# Altium PCB Sound_Sensor.PcbDoc (part 4 of 6)
Units mm, origin at the board's own origin, x right, y up, seen from the top; angles counter-clockwise.
Board outline 90.25 x 88.01 mm, 2 copper layers (Top Layer, Bottom Layer), stack 1.448 mm thick; 369 components, 272 nets, 1045 pads, 508 vias.
Unrouted connection lines stored in the file: 15.
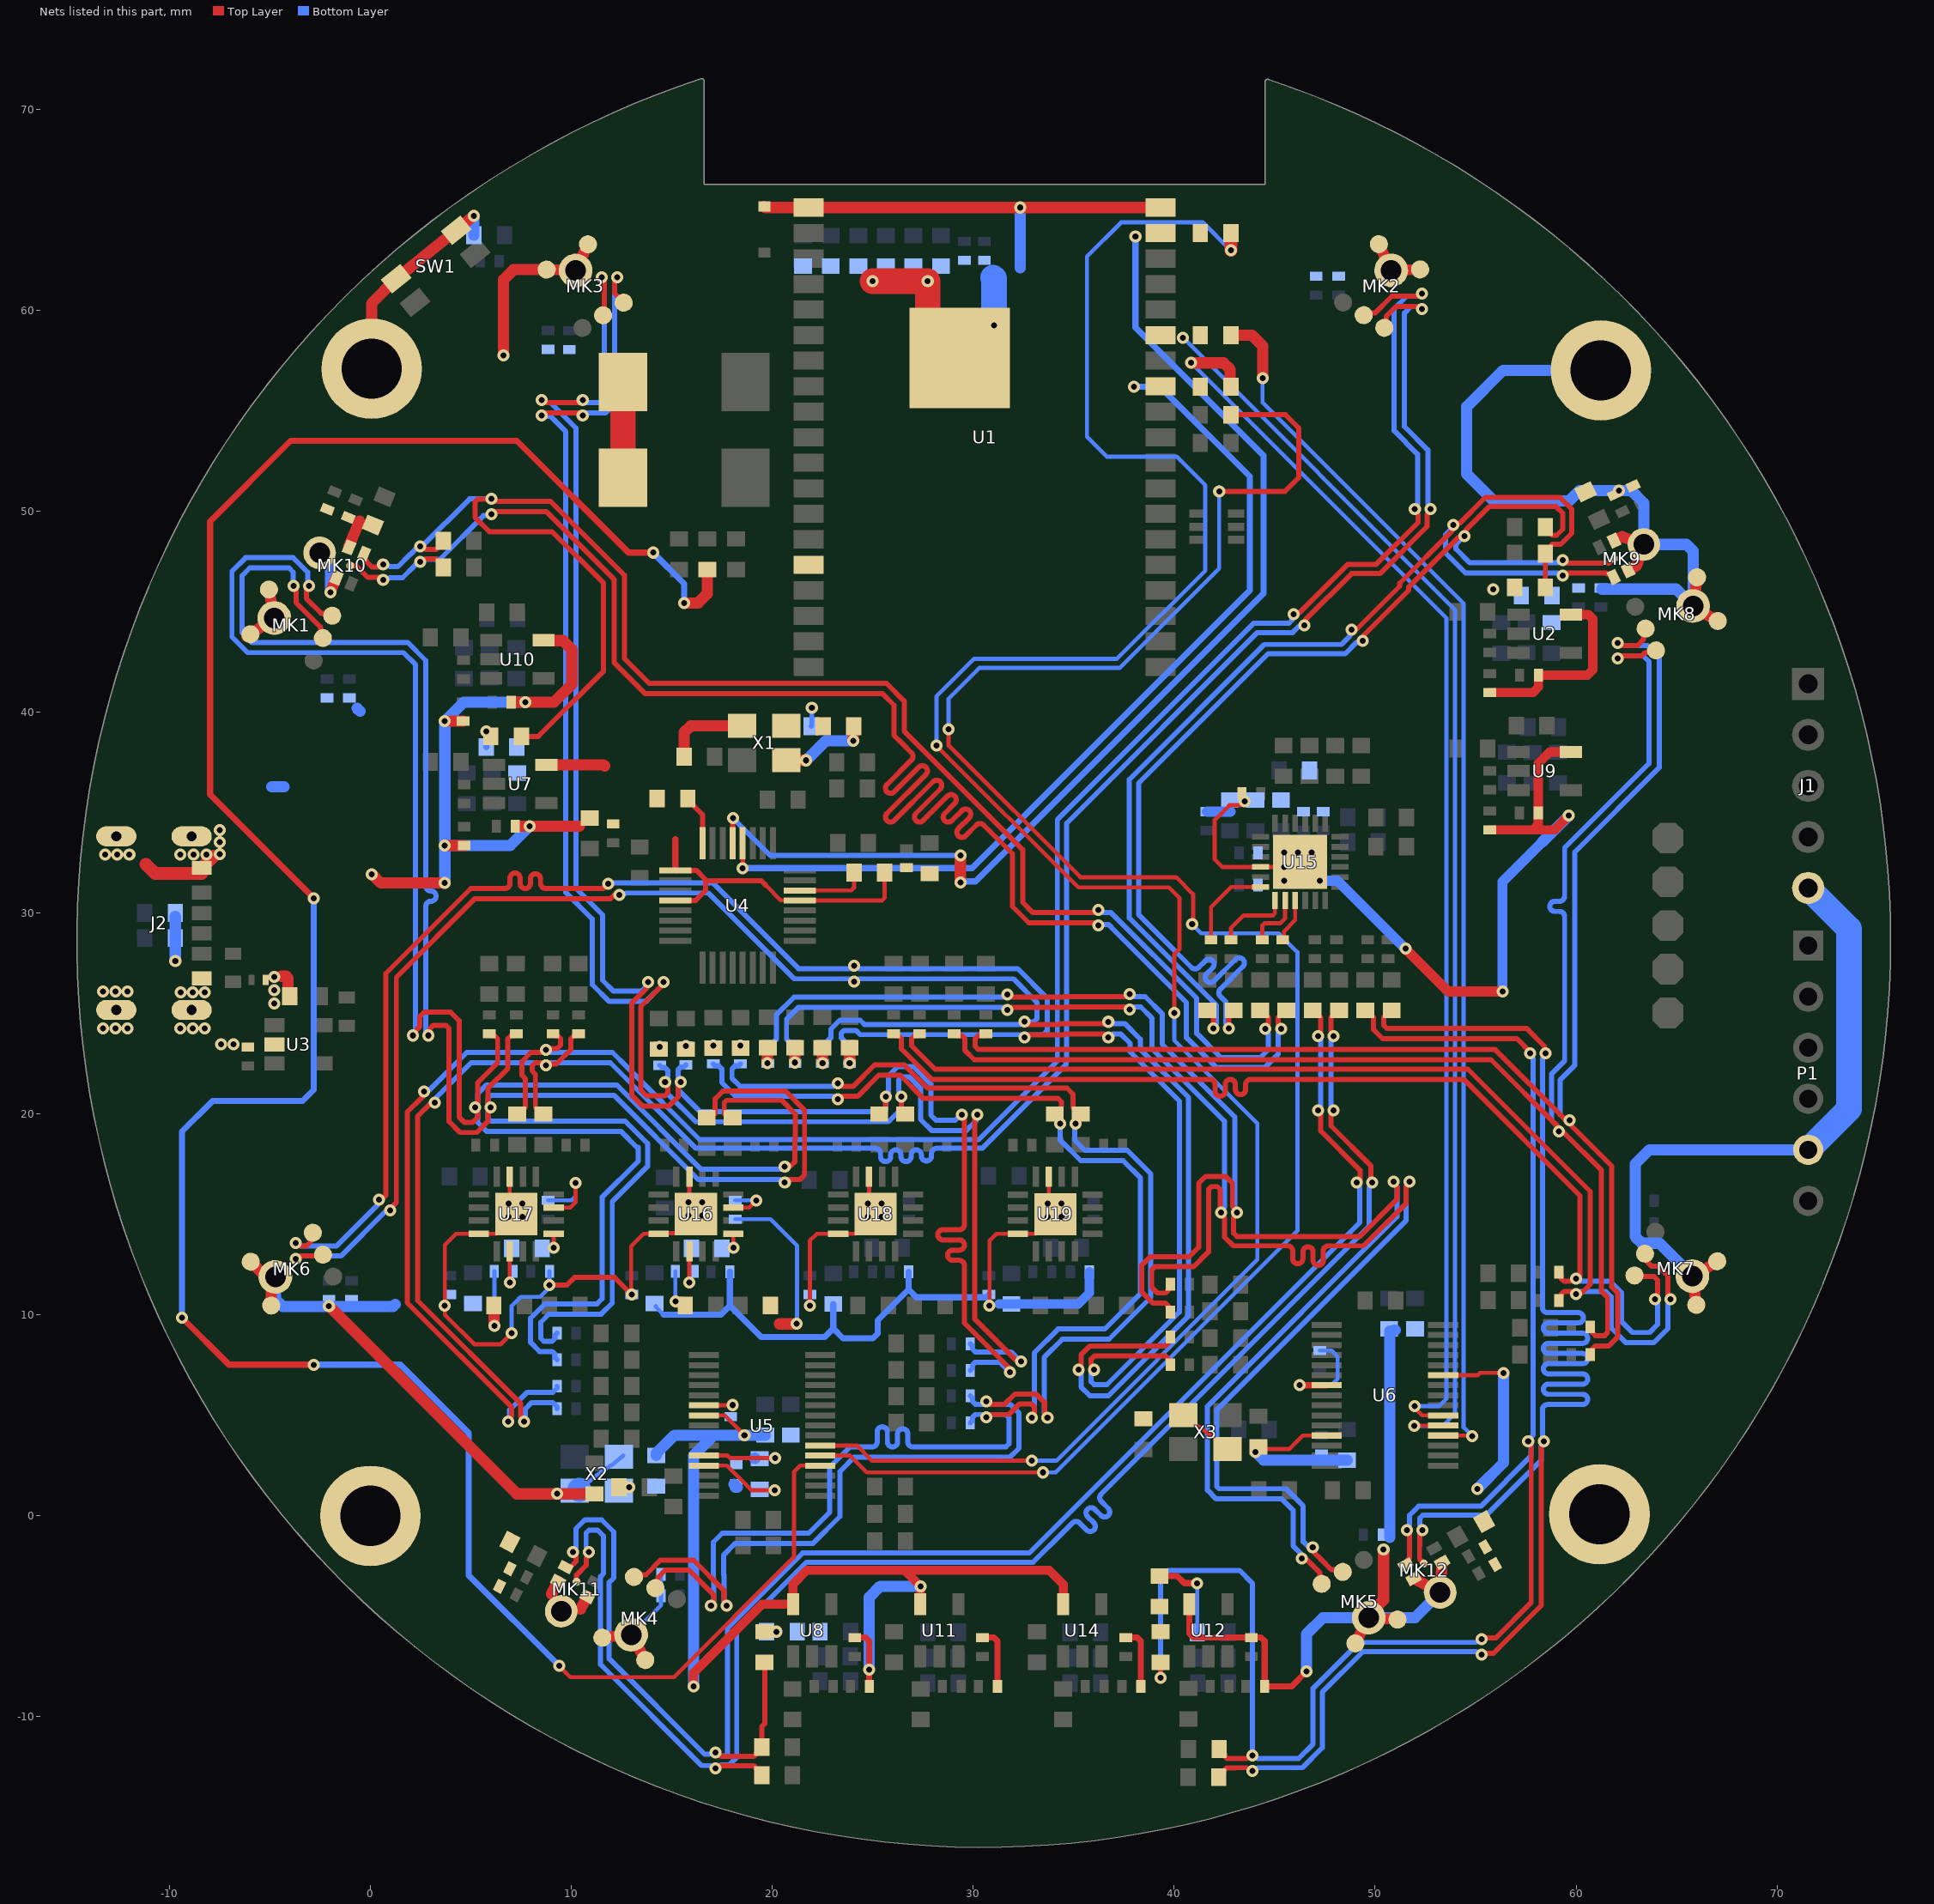
[diagram p3: the nets of this part, all layers, seen from the top]

## Via types
v1: diameter 0.6, hole 0.3, Top Layer to Bottom Layer, 508 vias

## Nets (pads, with @x,y where several pads share a name; then routed paths per layer and width w, separated by ;. In a path a pad name is that pad's centre, name@x,y a point inside that pad or via, vN(x,y) a via of type N, cw(c..) or ccw(c..) an arc to the next point about the centre after c; other vN are vias at no path point) (continued)
GND: C2.2 C3.2 C4.2 C5.2 C6.2 C7.2 C8.2 C9.2 C10.2 C11.2 C12.2 C13.2 C14.2 C15.2 C16.2 C17.2 C18.2 C19.2 C20.2 C21.2 C22.2 C27.2 C29.2 C31.2 C33.2 C34.2 C35.2 C36.2 C37.2 C38.2 C39.2 C40.2 C41.2 C42.2 C43.1 C44.1 C53.1 C54.1 C55.2 C56.2 C57.2 C58.2 C59.2 C61.1 C62.1 C70.1 C71.1 C72.2 C73.1 C74.1 C75.2 C76.2 C77.2 C78.2 C79.2 C80.2 C81.2 C82.2 C83.2 C84.2 C85.2 C86.2 C90.1 C91.1 C96.2 C97.2 C98.1 C99.1 C108.1 C112.1 C113.1 C114.1 C116.1 C118.1 C119.1 C120.2 C121.1 C122.1 C123.2 C124.1 C125.2 C126.2 C127.2 C128.1 C129.2 C130.2 C131.2 C132.2 C133.2 C134.2 C135.1 C136.1 C#2.2 D1.2 D2.1 J1.5 J2.A12 J2.B12 J2.MH1 J2.MH2 J2.MH3 J2.MH4 MK1.2 MK1.3 MK1.4 MK2.2 MK2.3 MK2.4 MK3.2 MK3.3 MK3.4 MK4.2 MK4.3 MK4.4 MK5.2 MK5.3 MK5.4 MK6.2 MK6.3 MK6.4 MK7.2 MK7.3 MK7.4 MK8.2 MK8.3 MK8.4 MK9.2 MK9.3 MK9.4 MK10.2 MK10.3 MK10.4 MK11.2 MK11.3 MK11.4 MK12.2 MK12.3 MK12.4 P1.5 pad.MH1 pad.MH2 pad.MH3 pad.MH4 R11.2 R12.2 R19.2 R20.2 R21.2 R31.2 R32.2 R33.2 R37.2 R41.2 SW1.2 U1.1 U1.15 U1.38 U1.39 U2.5 U3.2 U4.13 U4.25 U4.28 U5.7 U5.12 U6.7 U6.12 U6.25 U7.5 U8.5 U9.5 U10.5 U11.5 U12.5 U14.5 U15.4 U15.25 U16.11 U16.16 U16.17 U17.11 U17.16 U17.17 U18.11 U18.16 U18.17 U19.11 U19.16 U19.17 X1.2 X1.4 X2.2 X2.4 X3.2 X3.4 | length 510.8
  Top Layer w0.203: U17.11@6.938,16.873 6.938,15.338 U17.17@7.263,15.013 6.288,14.038 4.259,14.038 3.708,13.487 v1(3.708,10.465) 3.708,10.008 5.182,8.534 6.477,8.534 v1(7.036,9.093) ; v1(13.005,11.011) 12.979,11.036 12.979,13.411 13.606,14.038 U16.16@14.344,14.038 14.361,14.021 14.405,14.065 15.255,14.065 U16.17@16.204,15.013 15.879,15.338 U16.11@15.879,16.873 ; U5.12@16.595,2.497 17.746,2.497 18.974,1.27 v1(20.121,1.27) ; U5.7@16.595,4.997 17.634,4.997 v1(18.618,4.013) ; 19.685,31.369 20.421,30.633 21.365,30.633 U4.13@21.38,30.617 25.461,30.617 25.595,30.752 C22.2@25.595,32.006 ; v1(21.869,10.465) 21.869,13.691 22.217,14.038 U18.16@23.284,14.038 24.169,14.038 U18.17@25.144,15.013 24.819,15.338 U18.11@24.819,16.873 ; v1(30.81,10.463) 30.81,13.689 31.158,14.036 U19.16@32.225,14.036 33.11,14.036 U19.17@34.085,15.011 33.76,15.336 U19.11@33.76,16.871 ; X3.4@40.454,5.016 40.875,4.665 40.882,4.66 41.885,3.956 41.892,3.951 X3.2@42.654,3.316 ; v1(43.51,35.56) 43.307,35.357 42.745,35.357 42.016,34.628 42.016,32.66 42.387,32.289 46.021,32.289 U15.25@46.271,32.539 ; C74.1@44.188,3.327 45.745,3.327 46.414,3.996 U6.12@47.587,3.996 ; v1(45.466,31.598) 46.271,32.403 U15.25@46.271,32.539 ; U15.25@47.244,31.521 46.271,32.494 U15.25@46.271,32.539 ; U6.25@53.387,6.996 55.104,6.996 55.22,7.112 v1(56.388,7.112)
  Top Layer w0.254: v1(8.904,11.481) 9.779,11.481 10.16,11.862 12.154,11.862 v1(13.005,11.011) ; U4.28@15.18,30.617 16.19,30.617 16.688,31.115 16.688,31.648 16.219,32.117 U4.25@15.18,32.117 ; 16.688,31.598 19.456,31.598 19.685,31.369
  Top Layer w0.305: U4.25@15.18,32.117 15.18,33.664 ; C108.1@24.142,-6.096 C108.1@24.105,-6.058 24.65,-6.058 24.828,-6.236 v1(24.828,-7.645) R21.2@24.828,-8.484 ; C114.1@30.48,-6.058 31.025,-6.058 31.204,-6.236 R33.2@31.204,-8.484 ; C118.1@37.516,-6.058 C118.1@37.592,-6.058 ; C118.1@37.617,-6.058 38.163,-6.058 38.341,-6.236 R41.2@38.341,-8.484 ; U12.5@40.755,-4.397 40.755,-5.856 40.957,-6.058 C116.1@43.84,-6.058 44.322,-6.058 44.501,-6.236 R37.2@44.501,-8.484 45.847,-8.484 v1(46.584,-7.747) ; v1(46.247,6.496) U6.7@47.587,6.496
  Top Layer w0.457: v1(16.078,-8.484) 16.078,-7.823 19.504,-4.397 U8.5@21.034,-4.397 21.034,-3.401 21.719,-2.715 26.58,-2.715 ; U11.5@27.369,-4.397 27.369,-3.505 26.58,-2.715 ; U14.5@34.481,-4.397 34.481,-3.417 33.78,-2.715 26.58,-2.715 ; R31.2@55.702,34.138 57.847,34.138 ; R19.2@55.702,40.97 57.86,40.97 58.128,41.238 C90.1@58.128,41.834 60.565,41.834 60.833,42.102 60.833,44.628 60.618,44.843 U2.5@59.738,44.843 U2.5@59.809,44.771 ; v1(59.639,34.849) 58.928,34.138 57.847,34.138 ; U9.5@59.738,38.01 58.686,38.01 58.115,37.44 C112.1@58.115,34.976 58.115,34.405 57.847,34.138
  Top Layer w0.508: v1(51.511,28.219) 53.645,26.086 v1(56.337,26.086)
  Top Layer w0.559: MK1.4@-6.148,43.745 MK1.4@-5.966,43.869 -5.933,43.891 MK1.3@-4.775,44.679 ; MK6.2@-5.949,12.645 -5.192,11.887 MK6.3@-4.724,11.887 -4.932,11.68 MK6.4@-4.932,10.462 ; MK1.2@-5.044,46.093 MK1.3@-4.775,44.679 ; MK1.3@-4.666,44.753 MK1.3@-4.775,44.679 ; -4.444,26.848 -4.188,26.848 -4.099,26.758 -4.099,25.968 C2.2@-3.912,25.781 ; v1(-2.057,10.439) 7.29,1.092 C62.1@10.986,1.092 ; v1(-1.986,45.951) MK10.4@-1.707,46.688 ; MK10.2@-1.081,48.198 -1.079,48.203 -0.6,49.358 -0.569,49.422 -0.532,49.498 ; pad.MH1@0.068,57.075 0.068,60.336 SW1.2@1.283,61.551 1.552,61.768 4.007,63.756 SW1.2@4.275,63.973 4.54,64.195 v1(5.156,64.694) ; v1(0.076,31.928) 0.508,31.496 v1(3.708,31.496) ; v1(3.708,33.35) R20.2@4.674,33.35 ; v1(3.708,39.548) R32.2@4.623,39.548 ; v1(6.629,57.734) 6.629,61.519 7.122,62.012 MK3.4@8.777,62.012 MK3.3@10.216,61.967 ; C113.1@7.061,40.486 v1(7.72,40.486) 9.142,40.486 10.033,41.377 10.033,43.104 9.586,43.551 8.64,43.551 U10.5@8.62,43.571 ; C91.1@7.264,34.315 v1(7.923,34.315) 10.414,34.315 ; U7.5@8.76,37.375 11.596,37.375 11.659,37.313 ; 9.017,-3.886 MK11.2@9.352,-3.262 ; MK3.3@10.172,62.012 MK3.3@10.216,61.967 ; 10.467,-4.641 MK11.4@10.803,-4.017 ; MK3.2@10.83,63.177 MK3.2@10.83,63.27 MK3.3@10.216,61.967 ; MK4.2@11.547,-6.063 MK4.3@12.979,-5.918 MK4.4@13.683,-7.175 ; C44.1@15.613,37.771 15.613,38.98 15.941,39.307 X1.2@18.501,39.307 ; D1.2@19.609,65.158 19.609,65.149 19.658,65.1 U1.1@21.819,65.1 v1(32.334,65.1) U1.38@39.319,65.1 ; X1.4@20.701,37.607 20.716,37.592 v1(21.692,37.592) ; v1(24.028,38.557) 24.036,38.565 24.036,39.276 C43.1@24.054,39.294 ; MK5.2@49.019,-6.35 MK5.3@49.678,-5.069 50.125,-5.069 49.97,-4.915 49.97,-4.632 50.419,-4.183 v1(50.419,-1.676) ; MK5.3@50.123,-5.098 MK5.4@51.115,-5.164 ; MK2.4@50.186,63.186 MK2.4@50.186,63.279 MK2.3@50.8,61.976 MK2.2@52.239,62.02 ; MK12.2@51.911,-3.123 MK12.3@53.238,-3.81 MK12.4@53.334,-2.318 ; MK9.4@61.891,48.535 62.293,48.724 MK9.3@63.373,48.336 62.997,47.249 MK9.2@62.595,47.06 ; MK7.2@66.01,10.564 MK7.2@65.984,10.493 MK7.3@65.789,11.92 65.949,11.943 MK7.4@67.021,12.666 ; MK8.4@66.017,46.702 MK8.3@65.823,45.275 65.851,45.196 MK8.2@67.054,44.528
  Top Layer w0.635: -11.171,32.426 -10.708,31.962 J2.B12@-8.391,31.962 ; J2.B12@-8.324,32.308 J2.B12@-8.391,32.241 -7.815,32.817
  Top Layer w1.27: C21.2@12.571,51.943 C19.2@12.571,56.413 C19.2@12.571,56.693 ; v1(24.994,61.443) v1(27.737,61.443) 27.737,59.206 U1.39@29.328,57.615
  Bottom Layer w0.203: v1(7.036,9.093) 7.036,10.439 7.493,10.897 8.458,10.897 v1@8.915,11.354 ; v1@8.915,11.481 C99.1@8.915,12.167 ; X2.2@10.398,1.297 11.241,1.999 11.248,2.005 11.96,2.504 12,2.504 X2.4@12.598,2.997 ; MK4.3@12.979,-5.918 14.465,-4.432 C13.2@14.465,-3.988 C14.2@14.465,-2.909 ; C96.2@14.203,10.448 14.203,10.41 14.605,10.008 ; C134.2@30.582,10.871 30.81,10.643 v1(30.81,10.463) ; 42.812,35.039 42.901,34.95 42.926,34.95 ; v1(46.247,6.496) 47.822,6.496 48.133,6.807 48.133,7.925 47.828,8.23 C72.2@47.244,8.23
  Bottom Layer w0.305: 14.605,10.008 17.45,10.008 17.894,10.452 ; C98.1@17.894,12.141 17.894,10.452 ; 22.538,8.89 19.456,8.89 17.894,10.452 ; 22.606,8.89 23.038,9.322 ; C131.2@23.038,10.541 23.038,9.322 ; C135.1@26.784,12.141 26.784,11.265 ; C134.2@30.785,11.011 30.645,10.871 30.582,10.871 27.178,10.871 26.784,11.265 ; 23.038,9.322 23.52,8.839 25.019,8.839 25.248,9.068 25.248,9.728 26.784,11.265
  Bottom Layer w0.457: 31.286,10.541 C132.2@31.902,10.541 35.23,10.541 35.776,11.087 C136.1@35.776,12.141
  Bottom Layer w0.508: C123.2@41.631,35.039 42.812,35.039 ; v1(47.244,31.598) 48.133,31.598 v1(51.511,28.219) ; v1(56.337,26.086) 56.337,31.547 58.306,33.515
  Bottom Layer w0.559: v1(-9.703,27.61) R11.2@-9.703,28.753 R12.2@-9.703,29.82 ; -4.902,36.284 -4.28,36.284 ; MK6.3@-4.724,11.887 -4.724,10.77 -4.372,10.417 -2.061,10.417 -2.057,10.42 1.137,10.42 1.245,10.528 ; MK10.3@-2.524,47.916 -1.986,47.379 v1(-1.986,45.951) ; -0.66,40.183 -0.508,40.03 ; v1(3.708,31.496) v1(3.708,33.35) ; C20.2@5.156,63.729 v1(5.156,64.694) ; v1(7.72,40.486) 4.647,40.486 v1(3.708,39.548) v1(3.708,33.35) ; v1(7.923,34.315) 6.958,33.35 v1(3.708,33.35) ; C61.1@14.224,2.997 14.224,3.097 15.142,4.015 17.096,4.015 ; v1(16.078,-8.484) 16.078,2.997 17.096,4.015 ; C53.1@18.101,1.578 18.263,1.416 C53.1@18.151,1.416 ; v1(18.618,4.013) 17.934,4.013 17.932,4.015 17.096,4.015 ; v1@18.619,4.014 C56.2@19.652,4.015 ; v1(21.692,37.592) 22.657,38.557 v1(24.028,38.557) ; v1(24.828,-7.645) 24.828,-4.051 25.375,-3.505 v1(27.381,-3.505) ; 32.334,62.103 v1(32.334,65.1) ; v1(44.044,3.175) 44.055,3.175 44.46,2.77 C71.1@48.608,2.77 ; v1(46.584,-7.747) 46.584,-5.893 47.407,-5.069 MK5.3@49.678,-5.069 51.979,-5.069 MK12.3@53.238,-3.81 ; 50.724,-1.068 C57.2@50.724,9.195 ; C57.2@50.838,9.144 50.94,9.246 C57.2@51.003,9.246 ; v1(55.093,1.346) 56.388,2.642 v1(56.388,7.112) ; 58.306,33.515 v1(59.639,34.849) ; pad.MH4@61.232,56.995 56.36,56.995 54.559,55.194 54.559,51.841 55.905,50.495 59.65,50.495 60.164,51.009 62.758,51.009 63.373,50.394 MK9.3@63.373,48.336 65.495,48.336 65.823,48.009 MK8.3@65.823,45.275 64.984,46.114 C18.2@61.277,46.114 ; C9.2@62.943,14.501 62.943,13.891 63.271,13.564 64.146,13.564 MK7.3@65.789,11.92 ; C9.2@62.943,14.539 C10.2@62.943,15.681 62.943,17.503 63.652,18.212 P1.5@71.552,18.212
  Bottom Layer w1.194: X2.2@10.395,1.294 X2.2@10.398,1.297
  Bottom Layer w1.27: 30.988,61.62 31.039,61.57 v1(31.039,59.233) ; P1.5@71.552,18.212 73.584,20.244 73.584,29.21 J1.5@71.552,31.242
  other v1: 9.296,1.092 6.883,14.886 7.569,14.886 24.765,14.886 25.451,14.886 33.706,14.884 34.392,14.884 15.824,14.937 16.51,14.937 6.883,15.546 7.569,15.546 24.765,15.546 25.451,15.546 33.706,15.545 34.392,15.545 15.824,15.597 16.51,15.597 -7.421,23.47 -6.816,23.47 -13.292,24.257 -12.687,24.257 -12.082,24.257 -9.449,24.257 -8.844,24.257 -8.239,24.257 -4.789,25.485 -9.441,26.048 -8.836,26.048 -8.231,26.048 -13.292,26.086 -12.687,26.086 -12.082,26.086 -4.789,26.154 -4.789,26.822 45.466,32.283 -13.199,32.897 -12.594,32.897 -11.989,32.897 -9.449,32.897 -8.797,32.897 -8.145,32.897 -7.493,32.919 45.466,33.02 46.152,33.02 46.838,33.02 -7.493,33.524 -7.493,34.129 62.132,51.009
INTA: SB1.2 U5.21 | length 109.1
  Top Layer w0.203: U5.21@22.395,3.497 24.214,3.497 24.968,2.743 v1(32.918,2.743) ; v1(28.172,38.325) 35.23,31.267 39.751,31.267 40.259,30.759 40.259,28.184 40.005,27.93 v1(40.005,25.019)
  Top Layer w0.635: v1(42.824,62.967) SB1.2@42.824,63.83
  Bottom Layer w0.203: v1(28.172,38.325) 28.172,40.77 30.048,42.647 37.16,42.647 41.547,47.033 41.547,51.283 40.124,52.705 36.652,52.705 35.662,53.696 35.662,62.662 37.363,64.364 41.427,64.364 v1(42.824,62.967) ; v1(32.918,2.743) 34.138,2.743 44.145,12.751 44.145,12.827 44.145,13.894 44.145,19.533 40.005,23.673 v1(40.005,25.019)
INTA#: SB3.2 U6.21 | length 63.2
  Top Layer w0.203: v1(51.968,5.461) 51.968,5.364 52.333,5 53.383,5 U6.21@53.387,4.996
  Top Layer w0.559: v1(40.843,57.379) 40.851,57.371 42.462,57.371 42.79,57.043 42.79,56.22 SB3.2@42.824,56.185
  Bottom Layer w0.203: v1(40.843,57.379) 53.543,44.679 53.543,5.817 53.188,5.461 v1(51.968,5.461)
INTB: SB4.2 U5.20 | length 98.4
  Top Layer w0.203: U5.20@22.395,2.997 23.867,2.997 24.705,2.159 v1(33.477,2.159) ; v1(28.778,39.141) 28.778,38.329 35.331,31.775 40.107,31.775 40.945,30.937 40.945,29.489 v1(40.894,29.439)
  Top Layer w0.254: v1(42.24,50.978) 45.517,50.978 46.203,51.664 46.203,54.127 45.542,54.788 SB4.2@42.824,54.788
  Bottom Layer w0.203: v1(28.778,39.141) 28.778,40.665 30.302,42.189 37.287,42.189 42.24,47.142 v1(42.24,50.978) v1@42.24,51.183 ; v1(33.477,2.159) 34.112,2.159 46.135,14.182 46.135,28.053 45.207,28.981 41.351,28.981 v1(40.894,29.439)
INTB#: SB2.1 U1.33 U6.20 | length 62.9
  Top Layer w0.203: v1(51.943,4.47) 51.956,4.483 53.375,4.483 U6.20@53.387,4.496
  Bottom Layer w0.203: v1(40.437,58.623) 53.975,45.085 53.975,5.084 53.362,4.47 v1(51.943,4.47)
INTC: SB5.1 U5.19 | length 129
  Top Layer w0.203: v1(9.398,-7.468) 9.957,-8.026 15.113,-8.026 21.082,-2.057 21.082,2.184 21.395,2.497 U5.19@22.395,2.497
  Top Layer w0.305: v1(-9.373,9.855) -7.036,7.518 v1(-2.819,7.518) ; v1(-2.819,30.734) -7.976,35.89 -7.976,49.479 -3.962,53.492 7.286,53.492 12.849,47.93 v1(14.072,47.93)
  Top Layer w0.559: v1(15.621,45.415) 15.629,45.423 16.315,45.423 16.764,45.872 SB5.1@16.764,47.092
  Bottom Layer w0.305: v1(-9.373,9.855) -9.373,19.126 -7.849,20.65 -3.368,20.65 -2.819,21.199 v1(-2.819,30.734) ; v1(-2.819,7.518) 1.499,7.518 4.902,4.115 4.902,-2.972 v1(9.398,-7.468) ; v1(14.072,47.93) 15.621,46.38 15.621,45.45 v1@15.603,45.433
INTC#: SB2.2 U6.19 | length 62
  Top Layer w0.203: U6.19@53.387,3.996 54.805,3.996 v1(54.839,3.962)
  Top Layer w0.559: SB2.2@42.926,58.585 42.824,58.687 SB2.2@42.824,58.75 43.869,58.75 44.399,58.22 v1(44.399,56.617)
  Bottom Layer w0.203: v1(44.399,56.617) 44.399,55.397 54.407,45.39 54.407,4.394 v1(54.839,3.962)
M2_OUT1_N: MK9.6 SB55.1 SB84.1 | length 57.7
  Top Layer w0.254: v1(42.723,24.257) 42.723,24.903 SB84.1@42.966,25.146 ; v1(49.378,43.536) 49.454,43.612 49.454,43.838 51.675,46.06 51.675,46.214 54.141,48.68 ; 54.52,49.059 55.677,50.216 59.012,50.216 59.334,49.894 59.334,49.09 59.038,48.793 58.814,48.793 58.471,49.136 SB55.1@58.471,49.2 ; 59.59,47.396 61.63,47.396 61.859,47.625 MK9.6@61.881,47.625
  Bottom Layer w0.254: v1(42.723,24.257) 42.723,24.351 42.563,24.511 42.563,24.859 42.563,25.586 42.297,25.851 cw(c42.477,26.03) 42.297,26.21 43.422,27.335 ccw(c43.242,27.514) 43.422,27.694 ccw(c43.242,27.514) 43.063,27.694 41.98,26.611 cw(c41.8,26.791) 41.621,26.611 cw(c41.8,26.791) 41.621,26.97 41.913,27.262 ccw(c41.733,27.442) 41.913,27.621 ccw(c41.733,27.442) 41.553,27.621 41.22,27.288 cw(c41.04,27.467) 40.861,27.288 39.23,28.918 38.227,29.921 38.227,36.449 44.679,42.901 48.516,42.901 49.075,43.46 49.302,43.46 v1(49.378,43.536) ; v1(54.444,48.756) 54.016,48.328 54.016,48.118 54.71,47.423 59.106,47.423 59.241,47.558 v1(59.334,47.558)
M2_OUT1_P: MK9.1 SB31.1 SB54.1 SB83.1 | length 58
  Top Layer w0.254: SB83.1@41.656,25.146 41.691,25.146 41.945,24.892 v1(41.945,24.257) ; v1(48.828,44.086) 48.904,44.162 49.13,44.162 51.218,46.249 51.218,46.403 53.818,49.004 ; 54.197,49.382 55.487,50.673 59.202,50.673 59.792,50.083 59.792,48.901 59.227,48.336 58.814,48.336 58.471,47.993 SB54.1@58.471,47.879 SB31.1@58.471,46.203 ; v1@59.563,46.915 61.272,46.915 61.274,46.917 61.484,46.917 61.535,46.867 61.718,46.867 MK9.1@61.871,46.714
  Bottom Layer w0.254: v1(41.945,24.257) 41.945,24.351 42.105,24.511 42.105,25.408 37.77,29.743 37.77,36.638 44.489,43.358 48.327,43.358 48.752,43.783 48.752,44.01 v1(48.828,44.086) ; v1(53.894,49.306) 53.894,49.213 53.508,48.826 53.508,47.907 54.5,46.915 59.106,46.915 59.241,46.78 v1(59.334,46.78)
M2_OUT2_N: MK10.6 SB57.1 SB86.1 | length 86
  Top Layer w0.254: MK10.6@-0.997,47.284 -0.982,47.269 -0.698,47.269 -0.131,46.703 v1@0.406,46.703 ; 2.757,47.625 3.264,47.625 3.632,47.257 SB57.1@3.632,47.193 ; v1@6.147,49.962 6.15,49.965 8.766,49.965 12.141,46.59 12.141,42.443 13.665,40.919 25.476,40.919 26.06,40.335 26.06,38.837 26.48,38.418 26.929,37.968 cw(c26.749,37.789) 26.929,37.609 25.707,36.387 ccw(c25.886,36.208) 25.707,36.028 ccw(c25.886,36.208) 26.066,36.028 27.288,37.25 cw(c27.467,37.07) 27.647,37.25 cw(c27.467,37.07) 27.647,36.891 25.712,34.956 ccw(c25.892,34.776) 25.712,34.597 ccw(c25.892,34.776) 26.071,34.597 28.006,36.532 cw(c28.186,36.352) 28.365,36.532 cw(c28.186,36.352) 28.365,36.172 27.149,34.956 ccw(c27.328,34.776) 27.149,34.597 ccw(c27.328,34.776) 27.508,34.597 28.725,35.813 cw(c28.904,35.634) 29.084,35.813 cw(c28.904,35.634) 29.084,35.454 28.579,34.949 ccw(c28.759,34.77) 28.579,34.59 ccw(c28.759,34.77) 28.938,34.59 29.443,35.095 cw(c29.623,34.915) 29.802,35.095 cw(c29.623,34.915) 29.802,34.736 29.261,34.194 ccw(c29.441,34.015) 29.261,33.835 ccw(c29.441,34.015) 29.62,33.835 30.161,34.376 cw(c30.341,34.197) 30.521,34.376 31.953,32.944 31.953,31.42 31.953,30.32 32.767,29.507 v1@35.992,29.507 ; v1@45.185,24.46 45.185,24.809 45.522,25.146 SB86.1@45.586,25.146
  Bottom Layer w0.254: v1(0.635,46.568) 0.701,46.634 0.909,46.634 0.957,46.682 1.604,46.682 2.214,47.292 ; v1(2.489,47.465) 2.583,47.465 2.718,47.6 3.462,47.6 5.631,49.769 5.954,49.769 v1(6.02,49.835) ; v1(36.22,29.372) 36.277,29.429 36.732,29.429 36.881,29.28 36.881,29.27 40.615,25.536 40.615,23.793 42.106,22.301 44.508,22.301 45.185,22.978 45.185,24.003 45.32,24.138 v1(45.32,24.232)
M2_OUT2_P: MK10.1 SB33.1 SB56.1 SB85.1 | length 86.2
  Top Layer w0.254: MK10.1@-0.313,47.886 -0.313,47.643 -0.189,47.519 -0.189,47.479 0.079,47.211 v1@0.406,47.211 ; 2.757,48.082 3.264,48.082 3.632,48.451 SB56.1@3.632,48.514 ; v1@6.02,50.473 8.977,50.473 12.649,46.801 12.649,42.654 13.876,41.427 25.687,41.427 26.568,40.546 26.568,39.047 32.461,33.154 32.461,30.531 32.977,30.015 v1@35.992,30.015 ; v1(6.02,50.613) 6,50.593 5.356,50.593 5.207,50.444 5.207,49.682 5.918,48.971 9.042,48.971 11.608,46.405 11.608,42.037 8.357,38.786 SB33.1@7.518,38.786 ; SB85.1@44.276,25.146 44.339,25.146 44.677,24.809 v1@44.677,24.46
  Bottom Layer w0.254: v1(0.635,47.346) 0.701,47.279 0.909,47.279 0.957,47.232 1.376,47.232 1.986,47.842 1.995,47.842 2.396,48.242 v1(2.489,48.242) 2.583,48.242 4.943,50.603 v1@5.994,50.603 ; v1(36.22,30.15) 36.314,30.15 36.449,30.015 36.854,30.015 41.123,25.747 41.123,24.003 42.316,22.809 44.298,22.809 44.677,23.188 44.677,24.003 44.542,24.138 v1(44.542,24.232)
M2_OUT3_N: MK11.6 SB59.1 SB88.1 | length 82
  Top Layer w0.254: MK11.6@10.263,-3.284 10.263,-2.945 10.748,-2.46 10.748,-2.125 10.805,-2.068 10.805,-1.886 v1@10.748,-1.829 ; v1@17.358,-12.433 19.083,-12.433 19.202,-12.552 19.202,-12.624 SB59.1@19.482,-12.903 ; v1@47.805,24.105 47.805,24.809 48.142,25.146 SB88.1@48.206,25.146 ; v1(47.94,20.168) 47.94,20.074 47.805,19.939 47.805,19.404 49.794,17.414 v1@49.794,16.622
  Bottom Layer w0.254: v1@10.871,-1.897 v1(10.871,-1.803) 10.871,-1.71 10.736,-1.575 10.736,-0.86 10.885,-0.711 11.307,-0.711 11.604,-1.009 11.604,-2.88 11.455,-3.029 11.455,-7.399 16.485,-12.428 16.942,-12.428 17.077,-12.563 v1(17.17,-12.563) ; 17.438,-12.403 17.846,-12.403 18.232,-12.016 18.232,-5.782 21.703,-2.311 32.981,-2.311 34.486,-0.806 34.935,-0.357 cw(c35.115,-0.536) 35.295,-0.357 35.642,-0.705 ccw(c35.822,-0.525) 36.002,-0.705 ccw(c35.822,-0.525) 36.002,-0.346 35.69,-0.034 cw(c35.869,0.146) 35.69,0.326 cw(c35.869,0.146) 36.049,0.326 36.361,0.014 ccw(c36.54,0.193) 36.72,0.014 ccw(c36.54,0.193) 36.72,0.373 36.372,0.721 cw(c36.552,0.9) 36.372,1.08 36.848,1.556 49.7,14.408 49.7,16.332 49.86,16.493 v1(49.86,16.586) ; v1@47.805,20.396 47.805,23.647 47.94,23.782 v1(47.94,23.876)
M2_OUT3_P: MK11.1 SB39.1 SB58.1 SB87.1 | length 82.5
  Top Layer w0.254: MK11.1@9.723,-2.55 9.958,-2.55 10.24,-2.268 v1@10.24,-1.829 ; 17.468,-11.976 19.083,-11.976 19.202,-11.857 19.202,-11.786 SB58.1@19.482,-11.506 19.482,-10.49 19.634,-10.338 SB39.1@19.634,-7.48 ; SB87.1@46.896,25.146 46.959,25.146 47.297,24.809 v1@47.297,24.105 ; v1(47.162,20.168) 47.162,20.074 47.297,19.939 47.297,19.15 49.251,17.196 v1@49.251,16.586
  Bottom Layer w0.254: v1@10.093,-1.897 v1(10.093,-1.803) 10.093,-1.71 10.228,-1.575 10.228,-0.65 10.675,-0.203 11.517,-0.203 12.112,-0.798 12.112,-3.091 11.887,-3.316 11.887,-7.112 16.638,-11.863 16.849,-11.863 16.86,-11.852 17.104,-11.852 v1(17.17,-11.786) ; 17.438,-11.946 17.656,-11.946 17.775,-11.827 17.775,-5.593 21.514,-1.854 32.791,-1.854 49.243,14.597 49.243,16.332 49.082,16.493 v1(49.082,16.586) ; v1(47.162,23.876) 47.162,23.782 47.297,23.647 v1@47.297,20.396
M2_OUT4_N: MK12.6 SB61.1 SB90.1 | length 87.4
  Top Layer w0.254: SB61.1@42.215,-13.005 42.494,-12.725 42.494,-12.659 42.613,-12.54 43.024,-12.54 43.029,-12.535 43.624,-12.535 ; SB90.1@50.825,25.146 50.762,25.146 50.424,24.809 50.424,24.409 50.577,24.257 57.531,24.257 58.42,23.368 ; v1@52.224,-0.94 52.224,-1.493 52.214,-1.504 52.214,-2.15 52.425,-2.361 MK12.6@52.425,-2.372 ; v1(55.296,-6.917) 55.372,-6.841 55.887,-6.841 58.275,-4.452 58.275,3.387
  Bottom Layer w0.254: v1(43.891,-12.695) 43.999,-12.695 44.159,-12.535 46.379,-12.535 47.371,-11.543 47.371,-8.775 49.389,-6.756 55.028,-6.756 ; v1(52.359,-0.711) 52.359,-0.618 52.224,-0.483 52.224,-0.123 52.373,0.025 55.532,0.025 58.26,2.753 58.26,3.48 58.395,3.615 v1(58.395,3.708) ; v1@58.326,3.615 58.326,3.632 58.326,5.283 cw(c58.58,5.283) 58.58,5.537 60.323,5.537 ccw(c60.323,5.791) 60.323,6.045 58.631,6.045 cw(c58.631,6.299) 58.631,6.553 60.323,6.553 ccw(c60.323,6.807) 60.323,7.061 58.631,7.061 cw(c58.631,7.315) 58.631,7.569 60.323,7.569 ccw(c60.323,7.823) 60.323,8.077 58.631,8.077 cw(c58.631,8.331) 58.631,8.585 60.323,8.585 ccw(c60.323,8.839) 60.323,9.093 58.631,9.093 cw(c58.631,9.347) 58.631,9.601 60.113,9.601 ccw(c60.113,9.855) 60.113,10.109 58.58,10.109 cw(c58.58,10.363) 58.326,10.363 58.326,11.913 58.326,22.758 58.487,22.919 v1(58.487,23.012)
M2_OUT4_P: MK12.1 SB52.1 SB60.1 SB89.1 | length 86.5
  Top Layer w0.254: v1(39.319,-8.052) SB52.1@39.319,-7.29 ; SB60.1@42.24,-11.608 42.52,-11.887 42.52,-11.964 42.639,-12.083 42.834,-12.083 42.84,-12.078 43.624,-12.078 ; SB89.1@49.515,25.146 49.579,25.146 49.916,24.809 49.916,24.199 50.366,23.749 57.05,23.749 57.709,23.09 v1(57.709,23.012) ; MK12.1@51.515,-2.425 51.515,-2.3 51.706,-2.11 51.706,-1.293 51.716,-1.283 v1@51.716,-0.94 ; v1(55.296,-6.139) 55.356,-6.079 56.002,-6.079 57.767,-4.313 v1@57.767,3.464
  Bottom Layer w0.254: v1(39.319,-8.052) 39.319,-3.099 39.7,-2.718 43.256,-2.718 43.891,-3.353 v1(43.891,-11.917) 43.999,-11.917 44.159,-12.078 46.19,-12.078 46.914,-11.354 46.914,-8.585 49.2,-6.299 55.028,-6.299 ; v1(51.581,-0.711) 51.581,-0.618 51.716,-0.483 51.716,0.031 52.162,0.478 55.266,0.478 57.752,2.964 57.752,3.48 57.617,3.615 57.617,3.778 57.869,4.03 57.869,22.758 57.709,22.919 v1(57.709,23.012)
  other v1: 57.617,3.708
MIC_OUTS.OUT1_N: C105.1 C141.1 MK1.6 SB101.1 | length 102.9
  Top Layer w0.254: v1(-3.826,46.279) -3.826,46.185 -3.691,46.05 -3.691,45.436 -2.479,44.224 -2.479,43.798 MK1.6@-2.358,43.677 MK1.6@-2.369,43.688 ; v1(2.896,23.901) 2.962,23.968 2.962,24.231 3.14,24.409 3.763,24.409 3.912,24.261 3.912,19.627 4.463,19.075 5.301,19.075 5.85,19.624 5.85,20.091 5.985,20.226 v1(5.985,20.32) ; v1@5.85,20.549 5.85,21.268 6.845,22.263 6.845,23.74 6.994,23.889 7.163,23.889 C105.1@7.264,23.99 ; SB101.1@16.739,19.66 16.802,19.66 17.158,20.015 17.158,20.746 17.545,21.133 20.662,21.133 21.608,20.187 21.608,16.971 21.367,16.731 20.853,16.731 20.718,16.596 v1(20.625,16.596)
  Bottom Layer w0.254: v1(-3.826,46.279) -3.84,46.293 -3.84,46.96 -4.048,47.168 -5.994,47.168 -6.375,46.787 -6.375,43.942 -5.893,43.459 1.861,43.459 2.761,42.56 2.761,32.995 2.761,31.344 ccw(c3.015,31.344) 3.015,31.09 cw(c3.015,30.836) 3.015,30.582 ccw(c3.015,30.328) 2.761,30.328 2.761,29.693 v1@2.761,24.13 ; v1@2.761,23.935 v1@2.761,24.13 ; v1(2.896,23.901) 2.896,23.995 v1@2.761,24.13 ; v1@5.85,20.091 5.85,19.788 5.999,19.639 12.681,19.639 13.792,18.528 13.792,17.392 12.04,15.639 12.04,10.585 11.488,10.033 8.89,10.033 8.484,9.627 8.484,8.836 8.632,8.687 9.046,8.687 9.195,8.836 9.195,8.992 C141.1@9.296,9.093 ; v1@5.85,20.549 5.85,20.781 5.999,20.93 12.122,20.93 16.321,16.731 20.396,16.731 20.531,16.596 v1(20.625,16.596)
MIC_OUTS.OUT1_P: C104.1 C143.1 MK1.1 SB99.1 | length 102.7
  Top Layer w0.254: v1(-3.048,46.279) -3.048,46.185 -3.183,46.05 -3.183,45.647 -2.445,44.909 -2.017,44.909 MK1.1@-1.898,44.79 MK1.1@-1.905,44.798 ; v1(2.118,23.901) 2.118,23.995 2.454,24.331 2.454,24.831 2.689,25.066 3.991,25.066 4.42,24.638 4.42,19.837 4.674,19.583 5.091,19.583 5.342,19.834 5.342,20.091 5.207,20.226 v1(5.207,20.32) ; v1@5.342,20.549 5.342,21.552 6.337,22.547 6.337,23.74 6.189,23.889 6.02,23.889 C104.1@5.918,23.99 ; SB99.1@18.034,19.66 17.97,19.66 17.615,20.015 17.615,20.557 17.734,20.676 20.472,20.676 21.15,19.998 21.15,18.745 21.135,18.73 21.135,17.616 20.96,17.44 20.691,17.44 v1(20.625,17.374)
  Bottom Layer w0.254: v1(-3.048,46.279) -3.114,46.345 -3.114,46.953 -3.837,47.676 -6.205,47.676 -6.883,46.997 -6.883,43.732 -6.103,42.951 1.651,42.951 2.253,42.35 2.253,24.13 2.118,23.995 v1(2.118,23.901) ; v1@5.342,20.091 5.342,19.577 5.788,19.131 12.471,19.131 13.284,18.318 13.314,18.318 13.335,18.339 13.335,17.653 11.532,15.85 11.532,10.795 11.278,10.541 8.68,10.541 7.976,9.837 7.976,8.625 8.422,8.179 9.046,8.179 9.195,8.03 9.195,7.874 C143.1@9.296,7.772 ; v1@5.342,20.549 5.342,20.991 5.788,21.438 12.261,21.438 16.46,17.239 20.396,17.239 20.531,17.374 v1(20.625,17.374)
MIC_OUTS.OUT2_N: C106.1 C142.1 MK2.6 SB102.1 | length 114.8
  Top Layer w0.254: v1(2.667,21.107) 2.601,21.041 2.601,20.85 1.843,20.093 1.843,10.603 7.037,5.409 7.037,4.962 6.868,4.793 v1(6.868,4.699) ; SB102.1@7.315,19.99 7.379,19.99 7.709,20.32 7.709,21.76 7.549,21.92 7.549,22.609 7.995,23.055 v1@8.509,23.055 ; v1(8.738,23.19) 8.804,23.256 9.312,23.256 9.474,23.419 9.474,23.74 9.325,23.889 9.195,23.889 C106.1@9.093,23.99 ; v1@46.215,44.92 48.642,47.347 50.056,47.347 52.138,49.43 52.138,49.821 51.978,49.981 v1(51.978,50.089) ; MK2.6@49.433,59.745 49.537,59.85 49.996,59.85 50.835,60.689 v1@52.095,60.689
  Bottom Layer w0.254: v1@2.924,21.174 4.806,23.055 v1@8.509,23.055 ; v1(6.868,4.699) 6.934,4.765 6.934,5.265 7.816,6.147 9.08,6.147 9.296,6.363 C142.1@9.296,6.452 ; v1@8.966,23.055 12.048,23.055 12.767,22.336 16.383,18.72 30.276,18.72 34.188,22.632 34.188,34.646 43.954,44.411 45.707,44.411 45.861,44.566 45.861,44.792 v1(45.937,44.868) ; v1@52.113,50.317 52.113,52.827 50.952,53.988 50.952,60.06 51.581,60.689 52.095,60.689 52.23,60.823 v1(52.324,60.823)
MIC_OUTS.OUT2_P: C107.1 C144.1 MK2.1 SB100.1 | length 114.5
  Top Layer w0.254: v1(3.217,20.557) 3.151,20.491 2.96,20.491 2.351,19.883 2.351,10.716 7.476,5.591 7.476,4.962 7.645,4.793 v1(7.645,4.699) ; v1@8.509,22.547 8.205,22.547 8.057,22.399 8.057,22.13 8.217,21.97 8.217,20.32 8.547,19.99 SB100.1@8.611,19.99 ; v1(8.738,22.412) 8.804,22.479 9.252,22.479 9.982,23.208 9.982,23.74 10.131,23.889 10.262,23.889 C107.1@10.363,23.99 ; v1@46.539,44.597 48.832,46.89 50.245,46.89 52.596,49.24 52.596,49.821 52.756,49.981 v1(52.756,50.089) ; MK2.1@50.46,59.116 50.554,59.211 50.554,59.689 51.045,60.181 v1@52.095,60.181
  Bottom Layer w0.254: v1@3.283,20.814 5.016,22.547 v1@8.509,22.547 ; v1(7.645,4.699) 7.712,4.765 7.712,5.324 8.026,5.639 9.08,5.639 9.296,5.423 C144.1@9.296,5.334 ; v1@8.966,22.547 11.945,22.547 16.204,18.288 24.498,18.288 25.133,18.288 cw(c25.133,18.034) 25.387,18.034 25.387,17.878 ccw(c25.641,17.878) 25.895,17.878 25.895,17.958 cw(c26.149,17.958) 26.403,17.958 26.403,17.878 ccw(c26.657,17.878) 26.911,17.878 26.911,17.958 cw(c27.165,17.958) 27.419,17.958 27.419,17.914 ccw(c27.673,17.914) 27.927,17.914 27.927,18.034 cw(c28.181,18.034) 28.181,18.288 30.277,18.288 30.455,18.288 34.62,22.454 34.62,22.571 34.646,22.597 34.646,34.456 44.143,43.954 45.896,43.954 46.184,44.242 46.411,44.242 v1(46.487,44.318) ; v1(52.324,60.046) 52.23,60.046 52.095,60.181 51.792,60.181 51.46,59.849 51.46,54.198 52.621,53.038 v1@52.621,50.317
MIC_OUTS.OUT3_N: C46.1 C146.1 MK3.6 SB105.1 | length 92.9
  Top Layer w0.254: v1@8.763,55.39 v1@10.338,55.39 ; MK3.6@11.583,59.737 11.651,59.804 v1@11.651,61.392 ; 13.751,26.255 13.005,25.509 13.005,20.93 13.542,20.393 14.863,20.393 15.309,20.839 15.309,21.353 15.444,21.488 v1(15.444,21.582) ; SB105.1@25.324,19.99 25.387,19.99 25.641,20.244 25.641,20.841 v1(25.654,20.853) ; v1@29.562,19.964 29.562,16.104 29.562,14.491 cw(c29.308,14.491) 29.308,14.237 28.493,14.237 ccw(c28.493,13.983) 28.493,13.729 29.308,13.729 cw(c29.308,13.475) 29.308,13.221 28.982,13.221 ccw(c28.982,12.967) 28.982,12.713 29.308,12.713 cw(c29.308,12.459) 29.562,12.459 29.562,12.332 29.562,9.592 31.015,8.139 31.76,7.394 31.76,7.204 v1(31.826,7.137)
  Bottom Layer w0.254: v1@8.763,55.39 8.974,55.39 10.236,54.127 10.236,31.224 11.557,29.903 11.557,26.645 12.086,26.116 13.518,26.116 13.667,26.264 13.667,26.324 13.818,26.475 v1(13.818,26.568) ; v1(10.566,55.524) 10.66,55.524 10.795,55.39 11.502,55.39 11.651,55.538 11.651,61.392 11.516,61.527 v1(11.516,61.62) ; C46.1@15.708,22.441 15.606,22.339 15.458,22.339 15.309,22.191 15.309,21.209 16.401,20.117 25.505,20.117 25.654,20.266 v1(25.654,20.853) ; v1@25.789,21.082 25.789,21.387 ; 25.789,21.445 25.789,21.906 26.235,22.352 27.026,22.352 27.889,21.488 27.889,19.939 28.143,19.685 29.105,19.685 29.385,19.964 v1(29.427,19.964) ; C146.1@29.858,7.239 29.959,7.341 29.959,7.497 30.108,7.645 31.318,7.645 v1(31.826,7.137)
  other v1: 8.534,55.524
MIC_OUTS.OUT3_P: C45.1 C148.1 MK3.1 SB103.1 | length 91.9
  Top Layer w0.254: v1@8.763,54.882 v1@10.338,54.882 ; v1@12.159,61.392 12.159,60.837 12.61,60.386 MK3.1@12.61,60.366 ; v1(14.595,26.568) 14.595,26.475 13.462,25.341 13.462,21.191 13.752,20.901 14.652,20.901 14.801,21.05 14.801,21.353 14.666,21.488 v1(14.666,21.582) ; v1(26.432,20.853) 26.432,20.177 SB103.1@26.619,19.99 ; v1@30.07,19.964 30.07,9.803 31.226,8.647 32.119,7.754 32.31,7.754 v1(32.376,7.687)
  Bottom Layer w0.254: v1(8.534,54.747) 8.564,54.717 8.96,54.717 9.728,53.95 9.728,31.013 11.049,29.693 11.049,26.434 11.876,25.608 13.728,25.608 14.595,26.475 v1(14.595,26.568) ; v1(10.566,54.747) 10.66,54.747 10.795,54.882 11.712,54.882 12.159,55.328 12.159,61.392 12.294,61.527 v1(12.294,61.62) ; C45.1@14.402,22.415 14.503,22.314 14.652,22.314 14.801,22.165 14.801,20.999 16.191,19.609 25.781,19.609 26.432,20.26 v1(26.432,20.853) ; v1@26.297,21.082 26.297,21.695 26.446,21.844 26.815,21.844 27.381,21.278 27.381,19.729 27.933,19.177 29.667,19.177 30.139,19.648 30.139,19.898 v1(30.205,19.964) ; C148.1@29.858,8.56 29.959,8.458 29.959,8.302 30.108,8.153 31.879,8.153 32.345,7.687 v1(32.376,7.687)
MIC_OUTS.OUT4_N: C47.1 C145.1 MK4.6 SB106.1 | length 76.9
  Top Layer w0.254: MK4.6@14.187,-3.598 14.311,-3.474 14.311,-3.07 14.688,-2.692 15.85,-2.692 17.087,-3.93 v1@17.087,-4.242 ; v1(23.266,20.736) 23.36,20.736 23.495,20.871 24.249,20.871 25.306,21.928 26.357,21.928 27.508,20.777 34.214,20.777 34.388,20.603 34.388,20.393 34.379,20.383 34.379,20.244 34.125,19.99 34.066,19.99 34.32,19.736 v1(34.32,19.507) ; v1(30.658,4.907) 30.751,4.907 30.886,5.042 31.777,5.042 32.293,5.558 32.905,5.558 33.053,5.409 33.053,5.105 32.918,4.97 v1(32.918,4.877)
  Bottom Layer w0.254: v1(16.952,-4.47) 16.952,-4.377 17.087,-4.242 17.087,-3.155 17.069,-3.137 17.069,-1.314 17.519,-0.864 21.819,-0.864 22.86,0.178 22.86,2.413 23.876,3.429 24.841,3.429 24.968,3.429 ccw(c24.968,3.683) 25.222,3.683 25.222,4.175 cw(c25.476,4.175) 25.73,4.175 25.73,3.683 ccw(c25.984,3.683) 26.238,3.683 26.238,4.081 cw(c26.492,4.081) 26.746,4.081 26.746,3.683 ccw(c27,3.683) 27,3.429 28.753,3.429 31.627,3.429 31.775,3.578 31.775,4.893 31.627,5.042 v1@30.872,5.042 ; C47.1@17.065,22.492 17.167,22.39 17.341,22.39 17.49,22.241 17.49,21.82 17.49,21.562 18.181,20.871 23.038,20.871 23.173,20.736 v1(23.266,20.736) ; C145.1@29.858,4.623 29.959,4.724 29.959,4.893 30.108,5.042 v1@30.658,5.042 ; v1@33.045,5.11 33.045,8.113 34.229,9.296 36.551,9.296 38.325,11.071 38.325,16.811 37.458,17.678 35.35,17.678 34.32,18.708 v1(34.32,19.507)
MIC_OUTS.OUT4_P: C48.1 C147.1 MK4.1 SB104.1 | length 77.2
  Top Layer w0.254: MK4.1@13.119,-3.042 13.229,-2.932 13.716,-2.932 14.438,-2.21 16.085,-2.21 17.595,-3.719 v1@17.595,-4.242 ; v1(23.266,21.514) 23.36,21.514 23.495,21.379 24.039,21.379 25.096,22.436 26.568,22.436 27.719,21.285 34.666,21.285 34.963,20.988 34.963,20.32 35.293,19.99 35.352,19.99 35.098,19.736 v1(35.098,19.507) ; v1(30.658,5.685) 30.751,5.685 30.886,5.55 31.567,5.55 32.083,6.066 33.115,6.066 33.561,5.619 33.561,5.105 33.696,4.97 v1(33.696,4.877)
  Bottom Layer w0.254: v1(17.73,-4.47) 17.73,-4.377 17.595,-4.242 17.595,-2.945 17.577,-2.927 17.577,-1.956 18.161,-1.372 22.029,-1.372 23.368,-0.033 23.368,2.203 24.086,2.921 31.837,2.921 32.283,3.367 32.283,5.104 31.837,5.55 v1@30.872,5.55 ; C48.1@18.422,22.492 18.321,22.39 18.146,22.39 17.998,22.241 17.998,22.031 17.998,21.772 18.391,21.379 23.038,21.379 23.173,21.514 v1(23.266,21.514) ; C147.1@29.858,5.969 29.959,5.867 29.959,5.699 30.108,5.55 v1@30.658,5.55 ; v1@33.528,5.116 33.528,7.877 34.439,8.788 36.761,8.788 38.833,10.86 38.833,17.022 37.668,18.186 35.56,18.186 35.047,18.699 35.047,19.456 v1(35.098,19.507)
MIC_OUTS.OUT5_N: C50.1 C149.1 MK5.6 | length 83.8
  Top Layer w0.254: v1@31.928,25.306 34.693,25.306 34.71,25.324 37.562,25.324 37.697,25.189 v1(37.791,25.189) ; C149.1@39.814,11.532 39.713,11.43 39.713,11.236 39.564,11.087 39.167,11.087 38.887,11.367 38.887,12.242 39.036,12.391 40.966,12.391 41.707,13.132 41.707,16.234 41.856,16.383 42.142,16.383 42.291,16.234 v1@42.291,15.088 ; 42.502,14.834 42.502,13.874 42.94,13.437 44.628,13.437 45.644,13.437 cw(c45.644,13.183) 45.898,13.183 45.898,12.799 ccw(c46.152,12.799) 46.406,12.799 46.406,13.132 cw(c46.66,13.132) 46.914,13.132 46.914,12.709 ccw(c47.168,12.709) 47.422,12.709 47.422,13.183 cw(c47.676,13.183) 47.676,13.437 47.803,13.437 49.428,13.437 51.544,15.553 51.544,16.383 51.705,16.543 v1(51.705,16.637) ; v1@46.961,-1.825 47.297,-2.161 47.822,-2.686 48.283,-2.686 MK5.6@48.39,-2.792
  Bottom Layer w0.254: C50.1@21.136,23.457 21.035,23.558 20.861,23.558 20.712,23.707 20.712,24.716 21.302,25.306 31.471,25.306 31.606,25.171 v1(31.699,25.171) ; v1@38.019,25.324 38.342,25.324 38.892,24.773 38.892,23.251 42.502,19.641 42.502,15.355 ; v1(46.895,-1.568) 46.829,-1.502 46.638,-1.502 46.423,-1.287 46.423,0.49 45.568,1.346 42.73,1.346 42.232,1.346 42.113,1.465 42.113,5.258 51.544,14.689 51.544,16.383
  other v1: 42.342,15.088
MIC_OUTS.OUT5_P: C49.1 C151.1 MK5.1 | length 84.1
  Top Layer w0.254: v1@31.928,25.814 34.482,25.814 34.5,25.832 37.562,25.832 37.697,25.967 v1(37.791,25.967) ; C151.1@39.814,10.135 39.713,10.236 39.713,10.43 39.564,10.579 38.956,10.579 38.379,11.156 38.379,12.452 38.826,12.899 40.755,12.899 41.224,13.368 41.224,16.548 41.566,16.89 42.558,16.89 42.901,16.548 42.901,15.405 43.12,15.186 v1(43.12,15.088) ; 42.959,14.834 42.959,14.064 43.129,13.894 49.239,13.894 51.087,15.742 51.087,16.383 50.927,16.543 v1(50.927,16.637) ; v1@46.602,-2.184 47.087,-2.669 47.239,-2.821 47.239,-3.282 MK5.1@47.342,-3.385
  Bottom Layer w0.254: C49.1@19.779,23.457 19.881,23.558 20.055,23.558 20.204,23.707 20.204,24.927 21.091,25.814 31.471,25.814 31.606,25.949 v1(31.699,25.949) ; v1@38.019,25.832 38.552,25.832 39.4,24.984 39.4,23.461 43.01,19.851 v1@43.01,15.355 ; v1(46.345,-2.118) 46.279,-2.052 46.279,-1.861 45.915,-1.498 45.915,0.28 45.357,0.838 42.94,0.838 42.094,0.838 41.656,1.276 41.656,5.447 51.087,14.878 51.087,16.383
MIC_OUTS.OUT6_N: C51.1 C150.1 MK6.6 | length 100.9
  Top Layer w0.254: v1@-3.48,12.925 -2.421,12.925 MK6.6@-2.354,12.993 ; v1(0.991,15.189) 0.991,15.283 1.295,15.588 1.295,26.793 5.211,30.709 6.568,30.709 11.955,30.709 12.142,30.895 v1(12.386,30.895) ; v1@32.715,24.443 34.265,24.443 34.315,24.493 v1@36.5,24.493 ; v1@35.365,7.493 35.365,8.007 35.816,8.458 39.564,8.458 39.713,8.607 39.713,8.788 C150.1@39.814,8.89
  Bottom Layer w0.254: v1(-3.708,12.79) -3.615,12.79 -3.48,12.925 -1.464,12.925 0.734,15.123 0.924,15.123 v1(0.991,15.189) ; v1(12.386,30.895) 12.453,30.961 12.678,30.961 12.708,30.992 16.825,30.992 21.096,26.721 23.944,26.721 v1(24.079,26.586) 24.173,26.586 24.308,26.721 32.004,26.721 33.172,25.552 33.172,24.73 33.024,24.581 32.475,24.581 v1@32.469,24.587 ; C51.1@22.494,23.457 22.582,23.457 22.918,23.793 22.918,24.213 23.364,24.66 24.377,24.66 24.584,24.452 32.334,24.452 v1@32.469,24.587 ; v1(32.563,24.587) v1@32.469,24.587 ; v1(35.236,7.264) 35.236,7.171 35.365,7.042 35.365,6.415 35.811,5.969 36.728,5.969 40.716,9.957 40.716,20.817 38.315,23.217 38.315,23.722 37.544,24.493 v1@36.957,24.493
  other v1: 36.728,24.584
MIC_OUTS.OUT6_P: C52.1 C152.1 MK6.1 | length 100.6
  Top Layer w0.254: v1@-3.48,13.433 -3.176,13.433 -2.986,13.623 -2.986,13.96 MK6.1@-2.862,14.084 ; v1(0.441,15.739) 0.499,15.798 0.624,15.798 0.773,15.946 0.773,26.989 5.001,31.217 6.568,31.217 6.695,31.217 ccw(c6.695,31.471) 6.949,31.471 6.949,31.73 cw(c7.203,31.73) 7.457,31.73 7.457,31.471 ccw(c7.711,31.471) 7.965,31.471 7.965,31.693 cw(c8.219,31.693) 8.473,31.693 8.473,31.471 ccw(c8.727,31.471) 8.727,31.217 9.652,31.217 11.608,31.217 v1(11.836,31.445) ; v1@32.715,23.935 34.519,23.935 34.569,23.985 v1@36.5,23.985 ; v1@35.873,7.493 35.873,7.797 36.026,7.95 39.564,7.95 39.713,7.801 39.713,7.62 C152.1@39.814,7.518
  Bottom Layer w0.254: v1(-3.708,13.568) -3.615,13.568 -3.48,13.433 -1.675,13.433 0.374,15.482 0.374,15.673 v1(0.441,15.739) ; v1(11.836,31.445) 11.891,31.5 17.035,31.5 21.306,27.229 23.944,27.229 v1(24.079,27.364) 24.173,27.364 24.308,27.229 32.214,27.229 33.68,25.763 33.68,24.131 33.494,23.944 32.791,23.944 32.656,23.809 v1(32.563,23.809) 32.469,23.809 32.334,23.944 24.374,23.944 24.166,24.152 23.575,24.152 23.426,24.003 23.426,23.793 23.762,23.457 C52.1@23.851,23.457 ; v1(36.014,7.264) 36.014,7.177 35.873,7.036 35.873,6.677 36.021,6.528 36.652,6.528 40.267,10.142 40.267,20.631 37.807,23.09 37.807,23.512 37.333,23.985 v1@36.957,23.985
  other v1: 36.728,23.806
MIC_OUTS.OUT7_N: C101.1 C154.1 MK7.6 | length 54.9
  Top Layer w0.254: C101.1@27.33,23.99 27.229,23.889 27.085,23.889 26.937,23.74 26.937,23.388 28.1,22.225 54.617,22.225 60.706,16.136 60.706,11.82 60.706,11.517 v1@60.284,11.095 ; C154.1@59.144,10.719 59.245,10.82 59.245,11.015 59.394,11.163 v1@59.766,11.163 ; MK7.6@63.428,13.046 63.552,12.922 63.552,12.629 63.764,12.417 64.088,12.417 64.567,11.938 v1@64.567,10.998
  Bottom Layer w0.254: v1(59.995,11.028) 60.088,11.028 60.223,11.163 61.481,11.163 61.747,10.897 61.747,9.347 62.48,8.614 63.866,8.614 64.567,9.315 64.567,10.541 64.702,10.676 v1(64.702,10.77)
MIC_OUTS.OUT7_P: C100.1 C156.1 MK7.1 | length 54.6
  Top Layer w0.254: C100.1@26.035,23.99 26.137,23.889 26.28,23.889 26.429,23.74 26.429,23.228 27.94,21.717 41.144,21.717 41.78,21.717 cw(c41.78,21.463) 42.034,21.463 42.034,21.135 ccw(c42.288,21.135) 42.542,21.135 42.542,21.463 cw(c42.796,21.463) 43.05,21.463 43.05,21.21 ccw(c43.304,21.21) 43.558,21.21 43.558,21.463 cw(c43.812,21.463) 43.812,21.717 44.45,21.717 54.407,21.717 60.198,15.926 v1@60.198,11.82 ; C156.1@59.144,12.116 59.245,12.014 59.245,11.82 59.394,11.671 v1@59.766,11.671 ; MK7.1@62.91,11.959 62.96,11.909 63.877,11.909 64.059,11.728 v1@64.059,10.998
  Bottom Layer w0.254: v1(59.995,11.806) 60.088,11.806 60.223,11.671 61.691,11.671 62.255,11.107 62.255,9.677 62.811,9.122 63.656,9.122 64.059,9.525 64.059,10.541 63.924,10.676 v1(63.924,10.77)
MIC_OUTS.OUT8_N: C102.1 C153.1 MK8.6 | length 74.8
  Top Layer w0.254: C102.1@30.632,23.99 30.531,23.889 30.248,23.889 30.099,23.74 30.099,23.366 30.264,23.202 55.978,23.202 v1@59.43,19.749 ; v1@59.754,19.425 61.773,17.406 61.773,11.386 62.078,11.082 62.078,8.905 61.631,8.458 61.378,8.458 60.958,8.458 60.809,8.309 60.809,8.128 C153.1@60.707,8.026 ; v1@62.306,43.299 63.052,43.299 63.348,43.595 63.348,44.035 MK8.6@63.461,44.149
  Bottom Layer w0.254: v1(59.687,19.682) 59.621,19.749 59.43,19.749 59.216,19.963 59.216,21.7 59.94,22.425 59.94,33.035 64.135,37.229 64.135,42.718 63.554,43.299 62.306,43.299 62.171,43.434 v1(62.078,43.434) v1@61.984,43.434
MIC_OUTS.OUT8_P: C103.1 C155.1 MK8.1 | length 74.5
  Top Layer w0.254: C103.1@29.058,23.99 29.159,23.889 29.442,23.889 29.591,23.74 29.591,23.156 30.053,22.694 55.767,22.694 v1@59.071,19.389 ; v1@59.394,19.066 61.265,17.196 61.265,11.176 61.57,10.871 61.57,9.115 61.421,8.966 61.168,8.966 60.958,8.966 60.809,9.115 60.809,9.296 C155.1@60.707,9.398 ; v1@62.306,42.791 63.262,42.791 63.423,42.952 63.87,42.952 MK8.1@63.98,43.062
  Bottom Layer w0.254: v1(59.137,19.132) 59.071,19.199 59.071,19.389 58.776,19.685 58.776,21.978 59.432,22.635 59.432,29.693 59.432,29.82 ccw(c59.178,29.82) 59.178,30.074 58.947,30.074 cw(c58.947,30.328) 58.947,30.582 59.178,30.582 ccw(c59.178,30.836) 59.432,30.836 59.432,31.293 59.432,33.245 63.627,37.44 63.627,42.507 63.343,42.791 62.306,42.791 62.171,42.656 v1(62.078,42.656) v1@61.984,42.656
MISO: SB3.1 U1.31 U4.20 | length 45.5
  Top Layer w0.254: U4.20@18.507,33.444 U4.20@18.53,33.467 ; v1@18.533,32.228 U4.20@18.533,33.444
  Bottom Layer w0.305: v1(18.53,32.228) 29.942,32.228 43.762,46.048 43.762,51.717 39.294,56.185 v1(37.998,56.185)
MOSI: SB1.1 U1.37 U4.21 | length 56.1
  Top Layer w0.254: U4.21@18.03,33.467 v1@18.03,34.706
  Top Layer w0.559: v1(29.362,31.521) v1(29.362,32.859)
  Bottom Layer w0.254: v1(18.045,34.717) 19.903,32.859 v1(29.362,32.859)
  Bottom Layer w0.305: v1(29.362,31.521) 29.408,31.567 30.12,31.567 44.45,45.898 44.45,52.756 38.075,59.131 v1(38.075,63.652)
NetC1_1: C1.1 SB31.2
  other v1: 55.88,46.101
NetC1_2: C1.2 R10.2
NetC22_1: C22.1 U4.14 | length 3.5
  Top Layer w0.203: U4.14@21.38,31.117 23.929,31.117 24.071,31.26 C22.1@24.071,32.006
NetC23_1: C23.1 SB33.2 | length 0.8
  Bottom Layer w0.305: C23.1@5.766,38.252 v1@5.766,39.091
  other v1: 5.766,39.04
NetC23_2: C23.2 R13.2
NetC24_2: C24.2 U15.6 | length 4.5
  Top Layer w0.203: C24.2@41.834,28.664 41.834,30.277 42.846,31.289 U15.6@44.296,31.289
NetC25_2: C25.2 U15.7 | length 3.7
  Top Layer w0.203: C25.2@42.828,28.664 42.828,29.264 43.434,29.87 44.902,29.87 45.021,29.989 U15.7@45.021,30.614
NetC26_1: C26.1 SB39.2 | length 0.6
  Top Layer w0.203: SB39.2@19.609,-5.766 v1(20.218,-5.766)
NetC26_2: C26.2 R14.2
NetC28_1: C28.1 SB52.2
NetC28_2: C28.2 R35.2 | length 4.5
  Top Layer w0.305: C28.2@39.268,-2.997 40.157,-2.997 40.513,-3.353 v1(41.148,-3.353)
  Bottom Layer w0.203: R35.2@41.148,-5.791 v1(41.148,-3.353)
NetC30_2: C30.2 U15.8 | length 2.9
  Top Layer w0.203: C30.2@44.381,28.664 44.381,29.37 44.5,29.489 45.288,29.489 45.521,29.722 U15.8@45.521,30.614
NetC32_2: C32.2 U15.9 | length 2.2
  Top Layer w0.203: C32.2@45.426,28.664 45.461,28.699 45.461,29.078 46.021,29.638 U15.9@46.021,30.614
NetC36_1: C36.1 U4.24 | length 2.5
  Top Layer w0.203: C36.1@15.799,35.623 C36.1@15.799,35.687
  Top Layer w0.254: C36.1@15.799,35.623 16.53,34.892 U4.24@16.53,33.467
NetC43_2: C43.2 R7.1 X1.1 | length 0.9
  Bottom Layer w0.254: R7.1@21.946,39.294 21.971,39.319 v1(21.971,40.208)
NetC45_2: C45.2 SB10.1 | length 0
  Bottom Layer w0.559: v1(14.402,23.343) C45.2@14.402,23.355
NetC46_2: C46.2 SB11.1
  other v1: 15.708,23.381
NetC47_2: C47.2 SB12.1
  other v1: 17.065,23.397
NetC48_2: C48.2 SB13.1
  other v1: 18.422,23.401
NetC49_2: C49.2 SB14.1 | length 0.8
  Top Layer w0.559: v1(19.761,22.53) 19.769,22.538 19.769,23.282 SB14.1@19.779,23.292
NetC50_2: C50.2 SB15.1 | length 0.7
  Top Layer w0.559: v1(21.133,22.555) 21.135,22.557 21.135,23.29 SB15.1@21.136,23.292
NetC51_2: C51.2 SB16.1 | length 0.8
  Top Layer w0.559: SB16.1@22.494,23.292 22.499,23.286 22.499,22.535 v1(22.504,22.53)
NetC52_2: C52.2 SB17.1 | length 0.8
  Top Layer w0.559: v1(23.851,22.517) SB17.1@23.851,23.292
NetC53_2: C53.2 C54.2 U5.11 | length 3.6
  Top Layer w0.203: U5.11@16.595,2.997 17.78,2.997 17.907,2.87 v1(20.142,2.87)
  Bottom Layer w0.559: C54.2@19.126,2.845 C54.2@19.144,2.862 ; v1@20.134,2.862 v1(20.142,2.87)
NetC55_1: C55.1 U5.6 | length 1.4
  Top Layer w0.203: U5.6@16.595,5.497 16.602,5.505 18.027,5.505 v1(18.034,5.512)
NetC60_1: C60.1 U16.5 | length 0.7
  Top Layer w0.203: v1(18.064,13.339) U16.5@18.064,14.038
NetC60_2: C60.2 C64.1 U16.2 | length 1.5
  Top Layer w0.203: v1(15.879,11.611) U16.2@15.879,13.153
NetC61_2: C61.2 R8.1 X2.1 | length 0.5
  Top Layer w0.559: R8.1@12.37,1.422 v1(12.878,1.422) ccw(c12.878,1.448) v1@12.903,1.448
NetC63_1: C63.1 U17.5 | length 0.7
  Top Layer w0.203: v1(9.123,13.339) U17.5@9.123,14.038
NetC63_2: C63.2 C65.1 U17.2 | length 1.5
  Top Layer w0.203: v1(6.938,11.611) U17.2@6.938,13.153
NetC64_2: C64.2 SB91.1 | length 2.1
  Top Layer w0.559: v1(15.189,10.668) 15.2,10.668 15.238,10.63 15.566,10.63 15.668,10.528 SB91.1@15.668,10.465
  Bottom Layer w0.203: C64.2@15.176,12.167 15.183,12.16 15.183,10.674 v1(15.189,10.668)
NetC65_2: C65.2 SB92.1 | length 3.7
  Top Layer w0.559: SB92.1@6.147,10.465 6.164,10.447 6.164,9.457 v1(6.172,9.449)
  Bottom Layer w0.203: v1(6.172,9.449) C65.2@6.172,12.167
NetC66_1: C66.1 U16.7 | length 2.3
  Top Layer w0.203: U16.7@18.064,15.338 18.843,15.338 v1(19.202,15.697)
  Bottom Layer w0.203: C66.1@18.161,15.697 v1(19.202,15.697)
NetC66_2: C66.2 SB93.1 | length 8.5
  Top Layer w0.559: SB93.1@19.914,10.465 SB93.1@20.015,10.363 ; 20.35,9.55 v1(21.209,9.55)
  Bottom Layer w0.203: C66.2@18.161,14.757 19.914,14.757 21.234,13.437 21.234,9.576 v1(21.209,9.55)
NetC67_1: C67.1 U17.7 | length 4.3
  Top Layer w0.203: U17.7@9.123,15.338 9.953,15.338 10.211,15.596 v1(10.211,16.561)
  Bottom Layer w0.203: C67.1@8.839,15.697 10.008,15.697 10.211,15.9 v1(10.211,16.561)